# Altium PCB PCB1.PcbDoc (part 1 of 2)
Units mil, origin at the board's own origin, x right, y up, seen from the top; angles counter-clockwise.
Board outline 6000 x 4000 mil, 2 copper layers (Top Layer, Bottom Layer); 250 components, 133 nets, 708 pads, 265 vias.
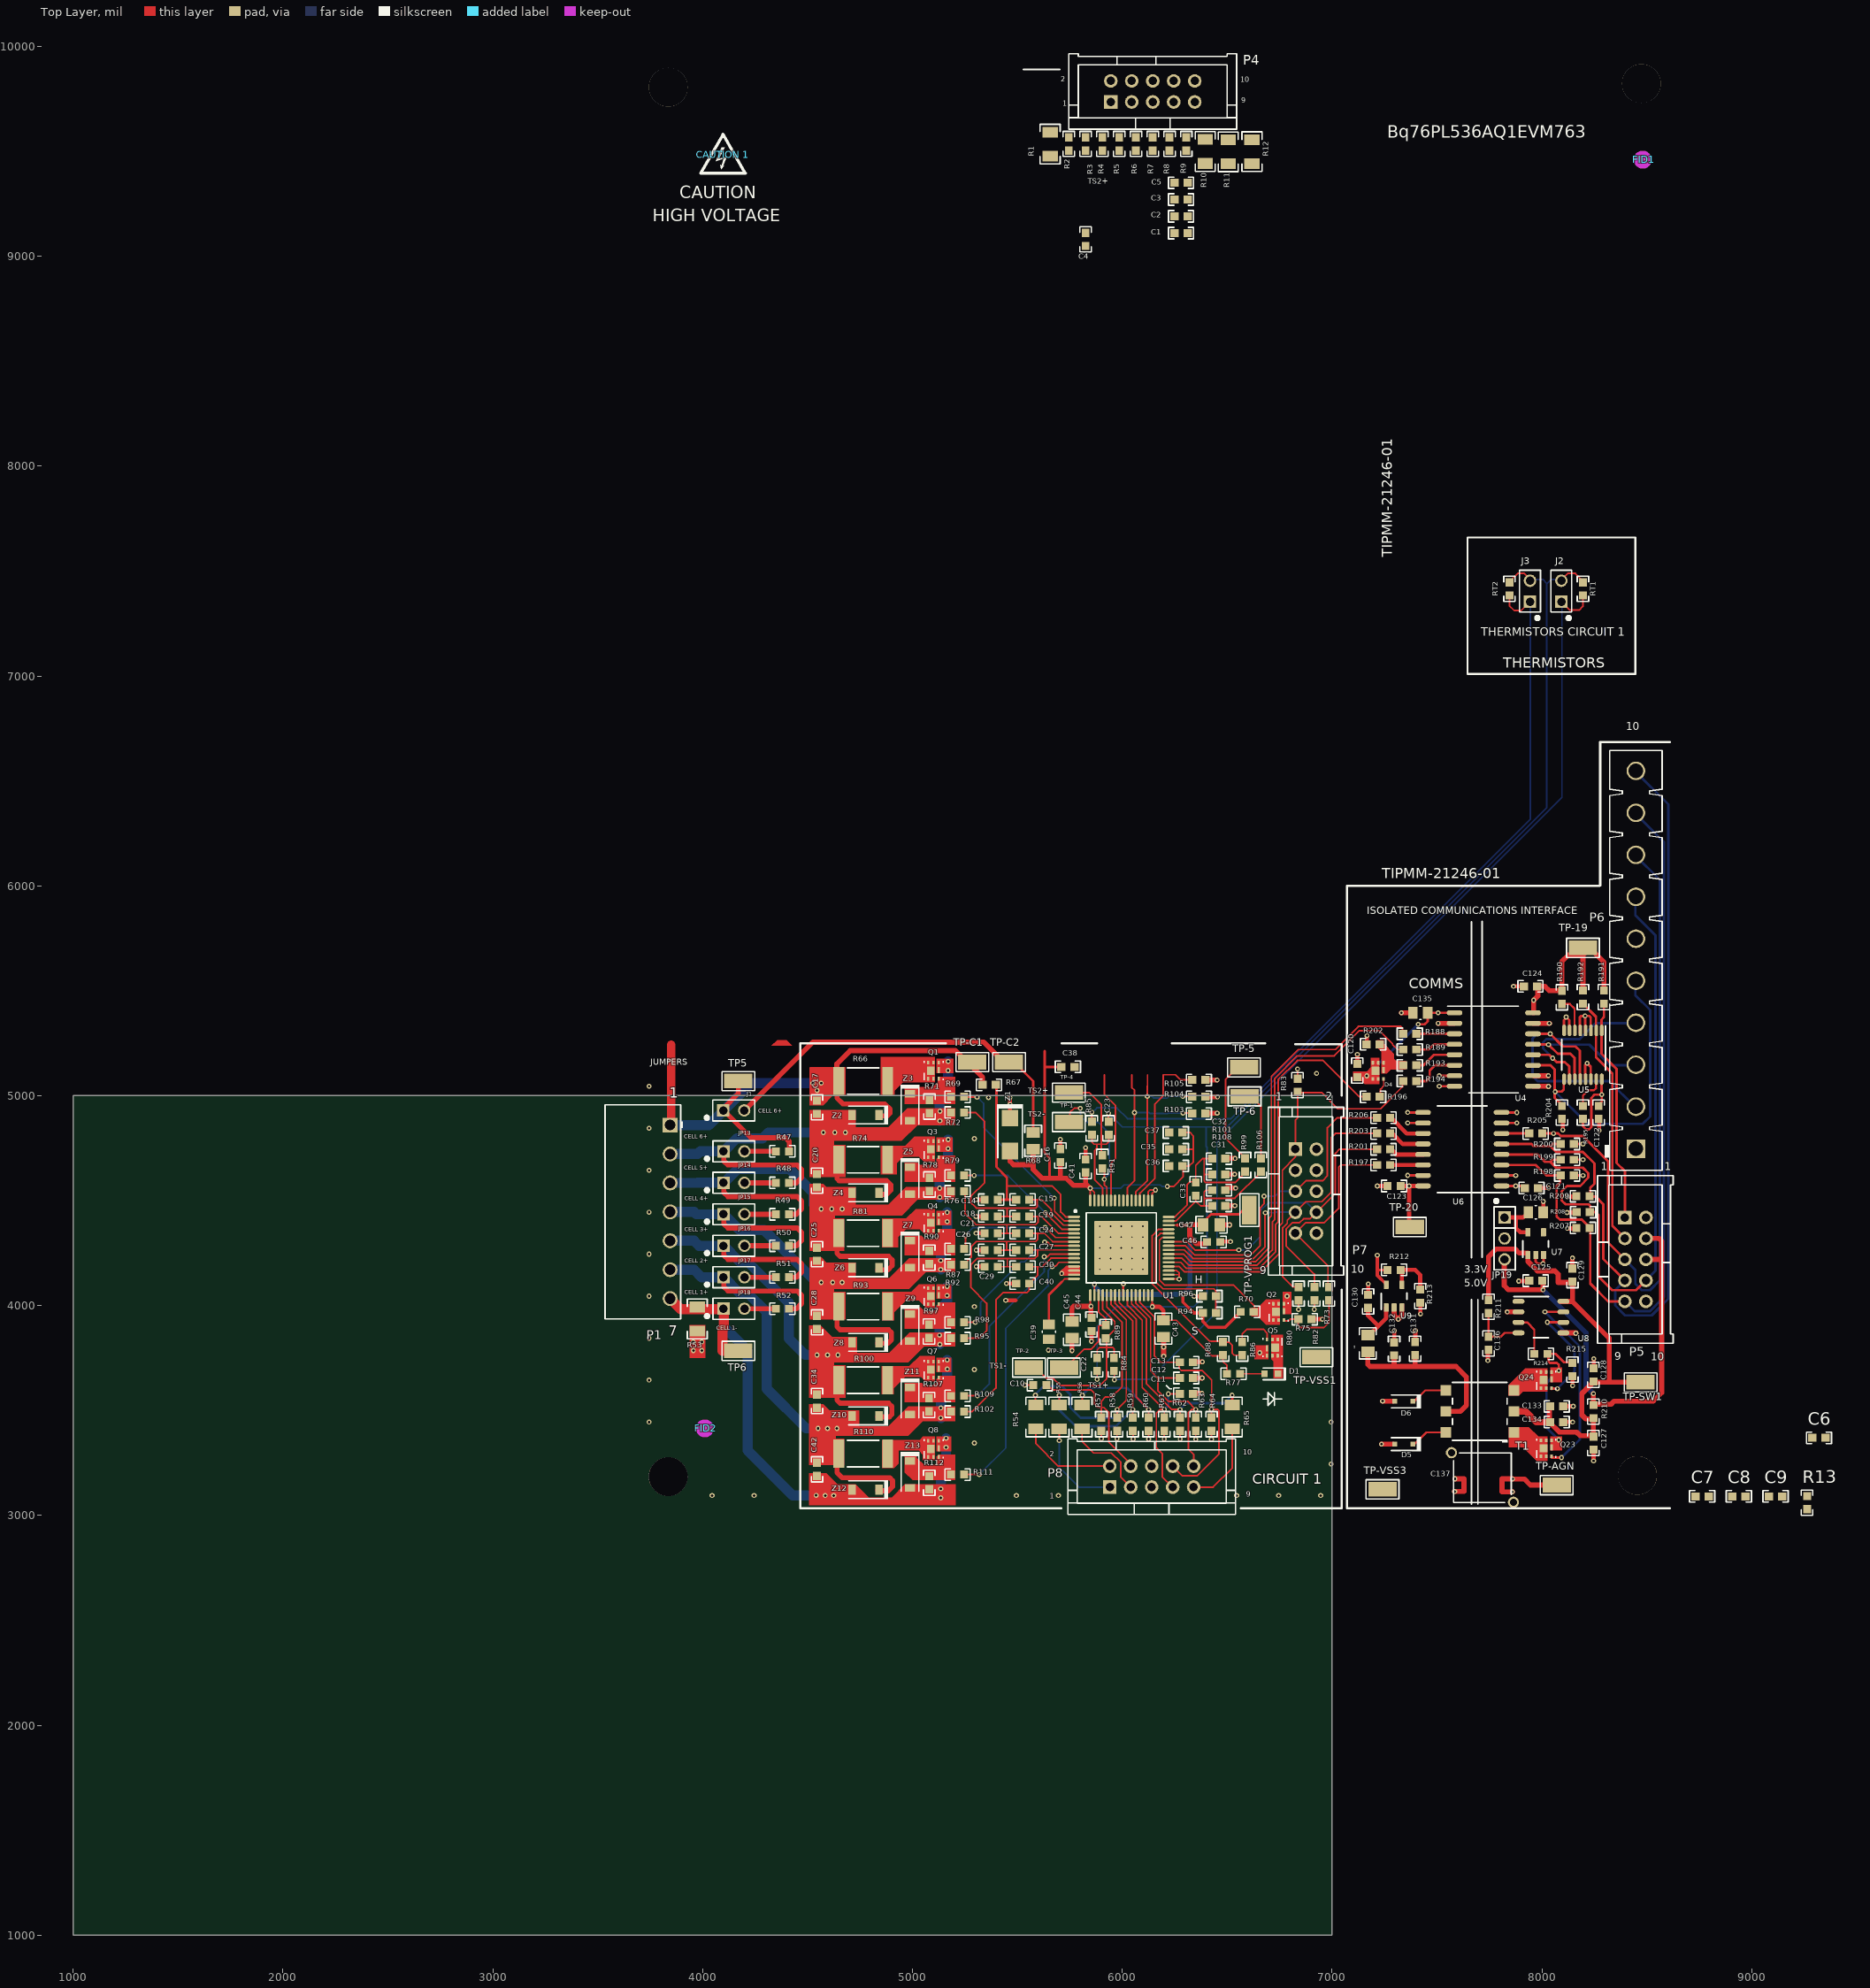
[diagram p0: Top Layer view]
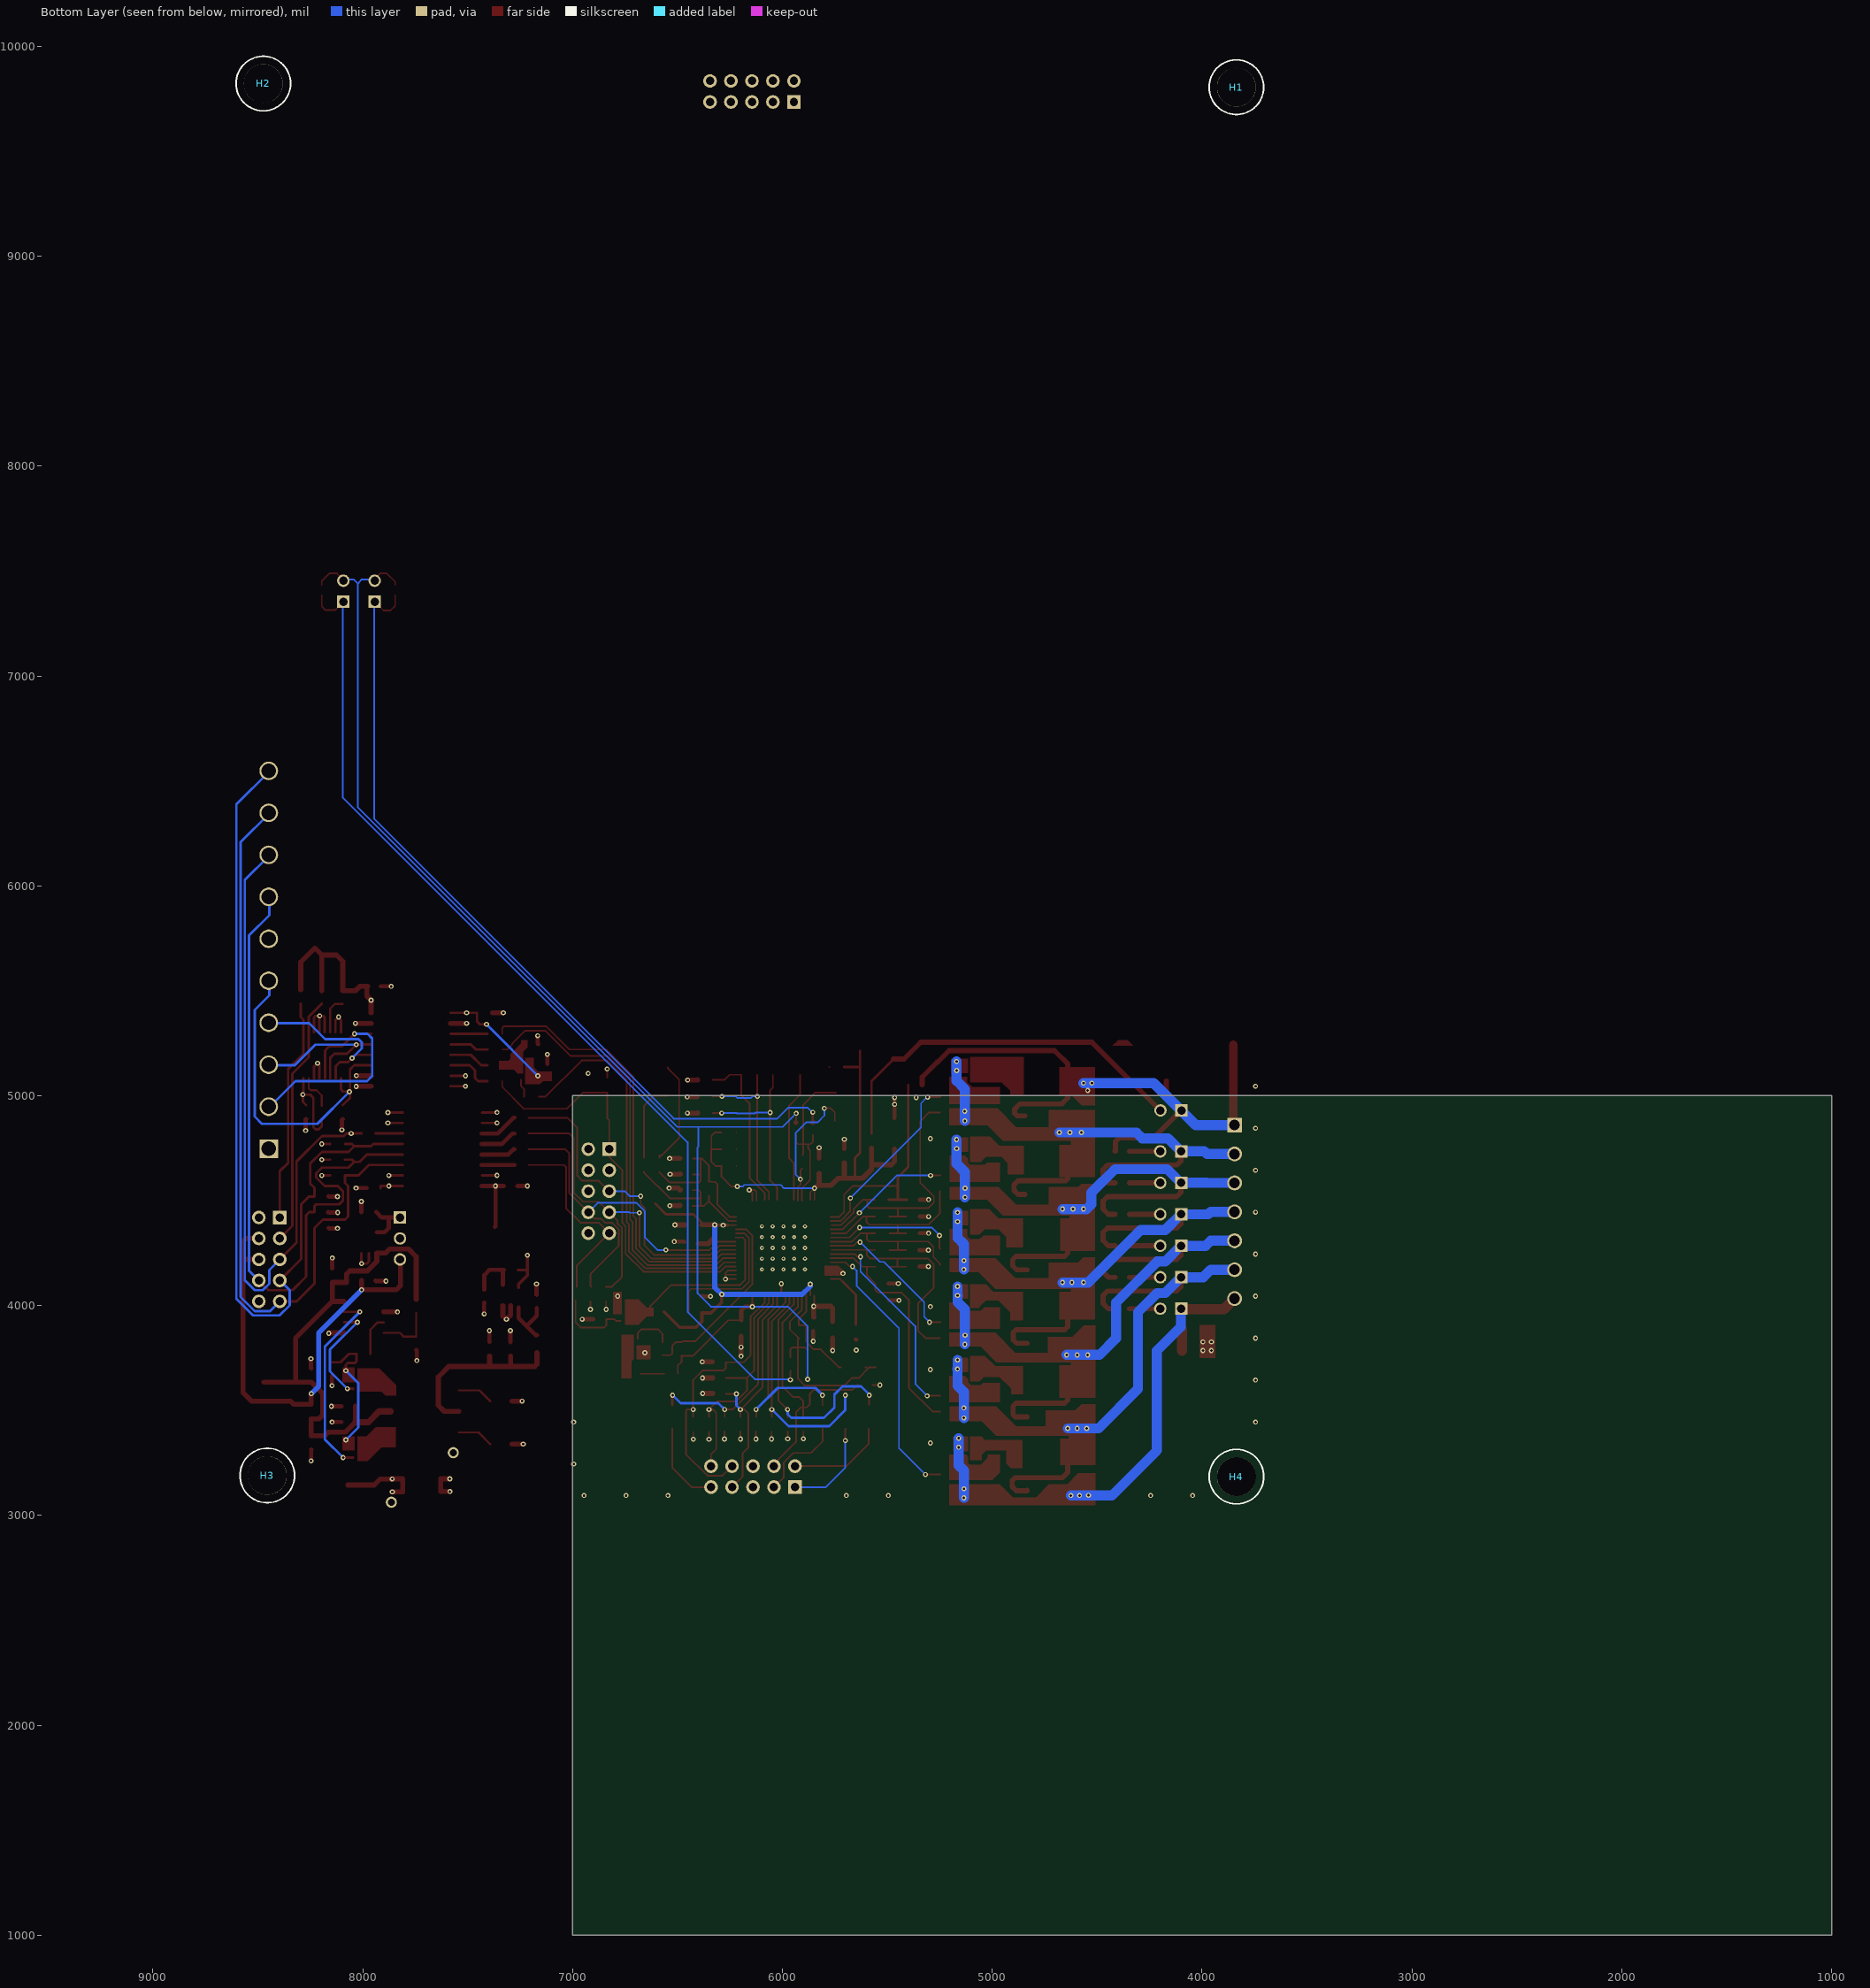
[diagram p1: Bottom Layer view, seen from below]

## Layer stack, top to bottom
Top Layer: signal copper 1.4
Dielectric: dielectric 12.6, FR-4, Dk 4.8
Bottom Layer: signal copper 1.4

## Board outline
1000,1000 7000,1000 7000,5000 1000,5000

## Design rules (kind name [scope] priority, off if disabled: settings)
Clearance [All] p1: gap=10
PolygonConnect [All] p1: connectstyle=Relief reliefconductorwidth=10 reliefentries=4 polygonreliefangle="90 Angle"
RoomDefinition Sheet1 [InComponentClass('Sheet1')] p1: confinementstyle=ConfineIn formatcopy=TRUE lockcomponents=FALSE outline 2953,1461 4953,1461 4953,2461 2953,2461
RoomDefinition Sheet2 [InComponentClass('Sheet2')] p2: confinementstyle=ConfineIn formatcopy=TRUE lockcomponents=FALSE outline 2953,1461 4953,1461 4953,2461 2953,2461
RoomDefinition Sheet5 [InComponentClass('Sheet5')] p3: confinementstyle=ConfineIn formatcopy=TRUE lockcomponents=FALSE outline 2953,1461 4953,1461 4953,2461 2953,2461
RoomDefinition Sheet_hardware [InComponentClass('Sheet_hardware')] p4: confinementstyle=ConfineIn formatcopy=TRUE lockcomponents=FALSE outline 2953,1461 4953,1461 4953,2461 2953,2461
RoutingVias [All] p1: holewidth=28 width=50 viastyle="Through Hole" minholewidth=28 minwidth=50 maxholewidth=28 maxwidth=50
SilkscreenOverComponentPads [All] p1: minsilkscreentomaskgap=10
SolderMaskExpansion [All] p1: expansion=4
TestPointUsage [All] p1: valid=0 allowmultiple=FALSE
Testpoint [All] p1: side=15 testpointundercomponent=TRUE minsize=40 maxsize=100 preferedsize=60 minholesize=0 maxholesize=40 preferedholesize=32 testpointgrid=1 style=1023 order=0123456789
Width [All] p1: maxlimit=10 minlimit=10 preferedwidth=10
23 further rules are at their usual default settings.

## Classes and differential pairs
component class Sheet_hardware: "CAUTION 1" FID1 FID2 H1 H2 H3 H4
component class Sheet5: C120 C121 C122 C123 C124 C125 C126 C127 C128 C129 C130 C131 C132 C133 C134 C135 C136 C137 D4 D5 D6 JP19 L1 Q23 Q24 R188 R189 R190 R191 R192 R193 R194 R195 R196 R197 R198 R199 R200 R201 R202 R203 R204 R205 R206 R207 R208 R209 R210 R211 R212 R213 R214 R215 T1 TP-19 TP-20 TP-AGN TP-SW1 TP-VSS3 U4 U5 U6 U7 U8 U9
component class Sheet2: C6 C7 C8 C9 C14 C15 C16 C17 C18 C19 C20 C21 C22 C23 C24 C25 C26 C27 C28 C29 C30 C31 C32 C33 C34 C35 C36 C37 C38 C39 C40 C41 C42 C43 C44 C45 C46 C47 D1 J1 J2 J3 Q1 Q2 Q3 Q4 Q5 Q6 Q7 Q8 R13 R66 R67 R68 R69 R70 R71 R72 R73 R74 R75 R76 R77 R78 R79 R80 R81 R82 R83 R84 R85 R86 R87 R88 R89 R90 R91 R92 R93 R94 R95 R96 R97 R98 R99 R100 R101 R102 R103 R104 R105 R106 R107 R108 R109 R110 R111 R112 RT1 RT2 TP-1 TP-2 TP-3 TP-4 TP-5 TP-6 TP-C1 TP-C2 TP-VPROG1 TP-VSS1 U1 Z1 Z2 Z3 Z4 Z5 Z6 Z7 Z8 Z9 Z10 Z11 Z12 Z13
component class Sheet1: C1 C2 C3 C4 C5 C10 C11 C12 C13 JP13 JP14 JP15 JP16 JP17 JP18 P1 P4 P5 P6 P7 P8 R1 R2 R3 R4 R5 R6 R7 R8 R9 R10 R11 R12 R47 R48 R49 R50 R51 R52 R53 R54 R55 R56 R57 R58 R59 R60 R61 R62 R63 R64 R65 TP5 TP6

## Components (designator, comment, footprint, x,y, rotation, side; value= is the part's Value field where it differs from the comment)
C1 "06035C104KAT2A" 0603[] 6280,9110 r180 top
C2 "06035C104KAT2A" 0603[] 6280,9190 r180 top
C3 "06035C104KAT2A" 0603[] 6280,9270 r180 top
C4 "06035C104KAT2A" 0603[] 5825,9080 r90 top
C5 "06035C104KAT2A" 0603[] 6280,9350 r180 top
C6 "GRM1885C1H330JA01D" 0603[] 9320,3370 r0 top
C7 "GRM1885C1H330JA01D" 0603[] 8763,3091 r0 top
C8 "GRM1885C1H330JA01D" 0603[] 8938,3091 r0 top
C9 "GRM1885C1H330JA01D" 0603[] 9113,3091 r0 top
C10 "06035C104KAT2A" 0603[] 5607,3621 r180 top
C11 "06035C104KAT2A" 0603[] 6305,3580 r0 top
C12 "06035C104KAT2A" 0603[] 6305,3655 r0 top
C13 "06035C104KAT2A" 0603[] 6305,3730 r0 top
C14 "06035C104KAT2A" 0603[] 5375,4505 r180 top
C15 "GRM188R72A104KA35D" 0603[] 5525,4505 r0 top
C16 "GRM188R72A104KA35D" 0603[] 5705,4715 r90 top
C17 "06035C104KAT2A" 0603[] 4545,4945 r270 top
C18 "06035C104KAT2A" 0603[] 5375,4425 r180 top
C19 "GRM188R72A104KA35D" 0603[] 5525,4425 r0 top
C20 "06035C104KAT2A" 0603[] 4545,4595 r270 top
C21 "06035C104KAT2A" 0603[] 5375,4345 r180 top
C22 "GRM188R71C473KA01D" 0603[] 5880,3720 r90 top
C23 "GRM188R71C473KA01D" 0603[] 5935,4845 r270 top
C24 "GRM188R72A104KA35D" 0603[] 5525,4345 r0 top
C25 "06035C104KAT2A" 0603[] 4545,4245 r270 top
C26 "06035C104KAT2A" 0603[] 5375,4265 r180 top
C27 "GRM188R72A104KA35D" 0603[] 5525,4265 r0 top
C28 "06035C104KAT2A" 0603[] 4545,3920 r270 top
C29 "06035C104KAT2A" 0603[] 5375,4185 r180 top
C30 "GRM188R72A104KA35D" 0603[] 5525,4185 r0 top
C31 "C0603C104K4RACTU" 0603[] 6460,4475 r0 top
C32 "C0603C104K4RACTU" 0603[] 6460,4700 r0 top
C33 "C0603C104K4RACTU" 0603[] 6350,4555 r270 top
C34 "GRM188R72A104KA35D" 0603[] 4545,3545 r270 top
C35 "GRM1885C1H330JA01D" 0603[] 6255,4745 r0 top
C36 "GRM1885C1H330JA01D" 0603[] 6255,4665 r0 top
C37 "GRM1885C1H330JA01D" 0603[] 6255,4825 r0 top
C38 "GRM1885C1H330JA01D" 0603[] 5740.67,5137.55 r180 top
C39 "C2012X7R1A106M125AC" 0805_145 5650,3875 r270 top
C40 "06035C104KAT2A" 0603[] 5525,4105 r180 top
C41 "06035C104KAT2A" 0603[] 5825,4665 r90 top
C42 "06035C104KAT2A" 0603[] 4545,3220 r270 top
C43 "GRM21BR71A225KA01L" 0805_HV 6196,3890 r270 top
C44 "06035C104KAT2A" 0603[] 5853,3910 r270 top
C45 "GRM21BR71A225KA01L" 0805_HV 5760,3885 r270 top
C46 "06035C104KAT2A" 0603[] 6435,4303 r0 top
C47 "GRM21BR71A225KA01L" 0805_HV 6425,4385 r0 top
C120 "06035C104KAT2A" 0603 7120,5120 r90 top
C121 "06035C104KAT2A" 0603 7950,4560 r0 top
C122 "06035C104KAT2A" 0603 8270,4920 r270 top
C123 "06035C104KAT2A" 0603 7295,4570 r180 top
C124 "06035C104KAT2A" 0603 7945,5521 r180 top
C125 "06035C104KAT2A" 0603 7970,4119 r180 top
C126 "C2012X7R1A106M125AC" 0805_145 7970,4445 r0 top
C127 "C1608X7R1C105K" 0603 8245,3345 r270 top
C128 "C0603C475K8PACTU" 0603 8245,3670 r90 top
C129 "06035C104KAT2A" 0603 8145,4145 r90 top
C130 "C0603C475K8PACTU" 0603 7171,4020 r90 top
C131 "C0603C475K8PACTU" 0603 7395,3795 r90 top
C132 "06035C104KAT2A" 0603 7295,3794 r90 top
C133 "06035C104KAT2A" 0603 8070,3520 r0 top
C134 "C0603C475K8PACTU" 0603 8070,3445 r0 top
C135 "C2012X7R1A106M125AC" 0805_145 7420,5395 r180 top
C136 "C0603C151J5GACTU" 0603 7745,3820 r270 top
C137 "DEBE33F102ZC3B" CAPRD750W60D700H1000 7716,3181 r180 top locked
"CAUTION 1" "DANGER HIGH VOLTAGE" IEC_HIGHVOLTAGE_SMALL 4097,9483 r0 top
D1 "APT1608SYCK" APT1608_YELLOW 6710,3675 r0 top
D4 "CSD25310Q2" TRANS_NEXFET_Q2 7219.53,5118.54 r90 top
D5 "BAT54HT1G" SOD-323 7342,3340 r180 top
D6 "BAT54HT1G" SOD-323 7342,3544 r180 top
FID1 "Fiducial" FIDUCIAL10-20 8480,9460 r0 top
FID2 "Fiducial" FIDUCIAL10-20 4010,3415 r0 top
H1 "9030" KEYSTONE_9030 3836.29,9805.08 r180 bottom locked
H2 "9030" KEYSTONE_9030 8473.51,9822.7 r180 bottom
H3 "9030" KEYSTONE_9030 8454.63,3190.37 r180 bottom
H4 "9030" KEYSTONE_9030 3835.84,3185.04 r180 bottom locked
J1 "PEC02SAAN" CONN_PEC02SAAN 4148,4930 r0 top
J2 "PEC02SAAN" CONN_PEC02SAAN 8092,7404 r90 top
J3 "PEC02SAAN" CONN_PEC02SAAN 7943,7404 r90 top
JP13 "PEC02SAAN" CONN_PEC02SAAN 4149,4735 r0 top
JP14 "PEC02SAAN" CONN_PEC02SAAN 4149,4585 r0 top
JP15 "PEC02SAAN" CONN_PEC02SAAN 4149,4435 r0 top
JP16 "PEC02SAAN" CONN_PEC02SAAN 4149,4285 r0 top
JP17 "PEC02SAAN" CONN_PEC02SAAN 4149,4135 r0 top
JP18 "PEC02SAAN" CONN_PEC02SAAN 4149,3985 r0 top
JP19 "PEC03SAAN" CONN_PEC03SAAN 7822,4320 r270 top
L1 "LB2012T100KR" 0805_HV 7170,3820 r90 top
P1 "395021007" MOLEX_395021007 3845,4446.61 r270 top locked
P4 "5103308-1" CONN_5103308-1 6145,9785 r0 top locked
P5 "5103308-1" CONN_5103308-1 8445,4220 r270 top locked
P6 "HPM-10-05-T-S" SAMTEC_HPM-10-05-T-S 8447.59,5647.75 r90 top
P7 "5103308-1" CONN_5103308-1 6875,4545 r270 top locked
P8 "5103308-1" CONN_5103308-1 6140,3185 r0 top locked
Q1 "CSD16301Q2" TRANS_NEXFET_Q2 5100,5119 r90 top
Q2 "CSD16301Q2" TRANS_NEXFET_Q2 6745,3970 r90 top
Q3 "CSD16301Q2" TRANS_NEXFET_Q2 5100,4745 r90 top
Q4 "CSD16301Q2" TRANS_NEXFET_Q2 5100,4395 r90 top
Q5 "CSD16301Q2" TRANS_NEXFET_Q2 6715,3800 r270 top
Q6 "CSD16301Q2" TRANS_NEXFET_Q2 5100,4045 r90 top
Q7 "CSD16301Q2" TRANS_NEXFET_Q2 5100,3695 r90 top
Q8 "CSD16301Q2" TRANS_NEXFET_Q2 5100,3317 r90 top
Q23 "CSD16301Q2" TRANS_NEXFET_Q2 8020,3320 r90 top
Q24 "CSD16301Q2" TRANS_NEXFET_Q2 8020,3645 r90 top
R1 "CRCW12061K00FKEA" 1206[] 5656,9534 r90 top
R2 "CRCW06030000Z0EA" 0603[] 5745,9535 r90 top
R3 "CRCW06030000Z0EA" 0603[] 5825,9535 r90 top
R4 "CRCW06030000Z0EA" 0603[] 5905,9535 r90 top
R5 "CRCW06030000Z0EA" 0603[] 5985,9535 r90 top
R6 "CRCW06030000Z0EA" 0603[] 6065,9535 r90 top
R7 "CRCW06030000Z0EA" 0603[] 6145,9535 r90 top
R8 "CRCW06030000Z0EA" 0603[] 6225,9535 r90 top
R9 "CRCW06030000Z0EA" 0603[] 6305,9535 r90 top
R10 "CRCW12061K00FKEA" 1206[] 6395,9499 r90 top
R11 "CRCW12061K00FKEA" 1206[] 6505,9497.63 r90 top
R12 "CRCW12061K00FKEA" 1206[] 6617.87,9497.81 r90 top
R13 "CRCW06030000Z0EA" 0603[] 9263,3061 r90 top
R47 "CRCW06031K00JNEA" 0603[] 4380,4735 r0 top
R48 "CRCW06031K00JNEA" 0603[] 4380,4585 r0 top
R49 "CRCW06031K00JNEA" 0603[] 4380,4435 r0 top
R50 "CRCW06031K00JNEA" 0603[] 4380,4285 r0 top
R51 "CRCW06031K00JNEA" 0603[] 4380,4135 r0 top
R52 "CRCW06031K00JNEA" 0603[] 4380,3985 r0 top
R53 "CRCW12060000Z0EA" 1206[] 3974.46,3936.2 r90 top
R54 "CRCW12061K00FKEA" 1206[] 5588,3469.49 r90 top
R55 "CRCW12061K00FKEA" 1206[] 5698,3469.49 r90 top
R56 "CRCW12061K00FKEA" 1206[] 5808,3469.49 r90 top
R57 "CRCW06031K00JNEA" 0603[] 5900,3435 r90 top
R58 "CRCW06031K00JNEA" 0603[] 5975,3435 r90 top
R59 "CRCW06031K00JNEA" 0603[] 6050,3435 r90 top
R60 "CRCW06031K00JNEA" 0603[] 6125,3435 r90 top
R61 "CRCW06031K00JNEA" 0603[] 6200,3435 r90 top
R62 "CRCW06031K00JNEA" 0603[] 6275,3435 r90 top
R63 "CRCW06031K00JNEA" 0603[] 6350,3435 r90 top
R64 "CRCW06031K00JNEA" 0603[] 6425,3435 r90 top
R65 "CRCW12061K00FKEA" 1206[] 6524,3469.49 r90 top
R66 "CRCW251247R0JNEG" 2512 4765,5070 r180 top
R67 "RG1608P-102-B-T5" 0603[] 5365.02,5051.75 r180 top
R68 "CRCW08050000Z0EA" 0805_HV 5575,4785 r270 top
R69 "RG1608P-102-B-T5" 0603[] 5215,4995 r180 top
R70 "ERJ-3EKF1002V" 0603[] 6595,3970 r180 top
R71 "CRCW06031M00JNEA" 0603[] 5081,4948 r90 top
R72 "RG1608P-102-B-T5" 0603[] 5215,4920 r180 top
R73 "RG1608P-102-B-T5" 0603[] 6985,4057 r270 top
R74 "CRCW251247R0JNEG" 2512 4765,4695 r180 top
R75 "ERJ-3EKF1002V" 0603[] 6870,3935 r180 top
R76 "RG1608P-102-B-T5" 0603[] 5215,4620 r180 top
R77 "CRCW06031K60JNEA" 0603[] 6530,3675 r180 top
R78 "CRCW06031M00JNEA" 0603[] 5081,4577 r90 top
R79 "RG1608P-102-B-T5" 0603[] 5215,4545 r180 top
R80 "ERJ-3EKF1002V" 0603[] 6840,4057 r270 top
R81 "CRCW251247R0JNEG" 2512 4765,4345 r180 top
R82 "ERJ-3EKF1002V" 0603[] 6915,4057 r270 top
R83 "ERJ-3EKF1002V" 0603[] 6835,5050 r90 top
R84 "CRCW06031K47FKEA" 0603[] 5960,3720 r270 top
R85 "CRCW06031K47FKEA" 0603[] 5855,4845 r90 top
R86 "CRCW0603100KFKEA" 0603[] 6480,3795 r270 top
R87 "RG1608P-102-B-T5" 0603[] 5215,4270 r180 top
R88 "CRCW0603100RJNEA" 0603[] 6571,3795 r270 top
R89 "CRCW06031K82FKEA" 0603[] 5921,3875 r270 top
R90 "CRCW06031M00JNEA" 0603[] 5080,4229 r90 top
R91 "CRCW06031K82FKEA" 0603[] 5905,4685 r90 top
R92 "RG1608P-102-B-T5" 0603[] 5215,4195 r180 top
R93 "CRCW251247R0JNEG" 2512 4765,3995 r180 top
R94 "CRCW06030000Z0EA" 0603[] 6415,3965 r180 top
R95 "RG1608P-102-B-T5" 0603[] 5215,3920 r180 top
R96 "CRCW06030000Z0EA" 0603[] 6415,4045 r0 top
R97 "CRCW06031M00JNEA" 0603[] 5079,3877 r90 top
R98 "RG1608P-102-B-T5" 0603[] 5215,3845 r180 top
R99 "CRCW06030000Z0EA" 0603[] 6585,4670 r90 top
R100 "CRCW251247R0JNEG" 2512 4765,3645 r180 top
R101 "CRCW06030000Z0EA" 0603[] 6460,4625 r0 top
R102 "RG1608P-102-B-T5" 0603[] 5215,3570 r180 top
R103 "CRCW06030000Z0EA" 0603[] 6365,4915 r180 top
R104 "CRCW06030000Z0EA" 0603[] 6365,4995 r180 top
R105 "CRCW06030000Z0EA" 0603[] 6365,5075 r180 top
R106 "CRCW06030000Z0EA" 0603[] 6660,4670 r90 top
R107 "CRCW06031M00JNEA" 0603[] 5079,3527 r90 top
R108 "CRCW06030000Z0EA" 0603[] 6460,4550 r0 top
R109 "RG1608P-102-B-T5" 0603[] 5215,3495 r180 top
R110 "CRCW251247R0JNEG" 2512 4765,3295 r180 top
R111 "RG1608P-102-B-T5" 0603[] 5215,3195 r180 top
R112 "CRCW06031M00JNEA" 0603[] 5080,3156 r90 top
R188 "CRCW0603100RJNEA" 0603 7370,5295 r0 top
R189 "CRCW0603100RJNEA" 0603 7370,5220 r0 top
R190 "CRCW06031M00JNEA" 0603 8095,5469 r90 top
R191 "CRCW06031M00JNEA" 0603 8295,5470 r90 top
R192 "CRCW06031M00JNEA" 0603 8195,5470 r90 top
R193 "CRCW0603100RJNEA" 0603 7370,5145 r0 top
R194 "CRCW0603100RJNEA" 0603 7370,5070 r0 top
R195 "CRCW06031M00JNEA" 0603 8195,4920 r270 top
R196 "ERJ-3EKF1002V" 0603 7195,4995 r0 top
R197 "CRCW0603100RJNEA" 0603 7245,4670 r180 top
R198 "CRCW06030000Z0EA" 0603 8120,4620 r0 top
R199 "CRCW06030000Z0EA" 0603 8120,4695 r0 top
R200 "CRCW06030000Z0EA" 0603 8120,4770 r0 top
R201 "CRCW0603100RJNEA" 0603 7245,4745 r180 top
R202 "RG1608P-102-B-T5" 0603 7195,5245 r0 top
R203 "CRCW0603100RJNEA" 0603 7245,4820 r180 top
R204 "CRCW0603100KFKEA" 0603 8095,4920 r90 top
R205 "CRCW0603100RJNEA" 0603 7970,4820 r180 top
R206 "CRCW0603100RJNEA" 0603 7245,4895 r180 top
R207 "ERJ-3EKF1002V" 0603 8195,4370 r0 top
R208 "ERJ-3EKF1002V" 0603 8196,4445 r0 top
R209 "ERJ-3EKF1002V" 0603 8195,4521 r0 top
R210 "RC0603FR-072RL" 0603 8245,3495 r270 top
R211 "ERJ-3EKF1002V" 0603 7745,3995 r270 top
R212 "RC0603FR-07523KL" 0603 7295,4170 r0 top
R213 "RC0603FR-07169KL" 0603 7420,4045 r90 top
R214 "RG1608P-102-B-T5" 0603 7995,3770 r0 top
R215 "CRCW06031R00JNEA" 0603 8145,3695 r90 top
RT1 "ERT-J1VG103FA" 0603[] 8195,7415 r90 top
RT2 "ERT-J1VG103FA" 0603[] 7845,7415 r90 top
T1 "Transformer, 400 uH, SMT" COILCRAFT_Q4470-CL 7704,3496 r180 top
TP5 "5015" TESTPOINT_KEYSTONE_MINIATURE 4170,5070 r0 top
TP6 "5015" TESTPOINT_KEYSTONE_MINIATURE 4170,3785 r0 top
TP-1 "5015" TESTPOINT_KEYSTONE_MINIATURE 5745,4875 r0 top
TP-2 "5015" TESTPOINT_KEYSTONE_MINIATURE 5555,3705 r0 top
TP-3 "5015" TESTPOINT_KEYSTONE_MINIATURE 5722,3705 r0 top
TP-4 "5015" TESTPOINT_KEYSTONE_MINIATURE 5745,5015 r0 top
TP-5 "5015" TESTPOINT_KEYSTONE_MINIATURE 6580,5135 r0 top
TP-6 "5015" TESTPOINT_KEYSTONE_MINIATURE 6582.44,4997.02 r0 top
TP-19 "5015" TESTPOINT_KEYSTONE_MINIATURE 8195,5705 r0 top
TP-20 "5020" TESTPOINT_KEYSTONE_MINIATURE 7370,4375 r0 top
TP-AGN "5015" TESTPOINT_KEYSTONE_MINIATURE 8070,3145 r0 top
TP-C1 "5015" TESTPOINT_KEYSTONE_MINIATURE 5285,5160 r0 top
TP-C2 "5015" TESTPOINT_KEYSTONE_MINIATURE 5460,5160 r0 top
TP-SW1 "5015" TESTPOINT_KEYSTONE_MINIATURE 8470,3635 r0 top
TP-VPROG1 "5015" TESTPOINT_KEYSTONE_MINIATURE 6605,4455 r90 top
TP-VSS1 "5015" TESTPOINT_KEYSTONE_MINIATURE 6925,3755 r0 top
TP-VSS3 "5015" TESTPOINT_KEYSTONE_MINIATURE 7240,3125 r0 top
U1 "BQ76PL536ATPAPRQ1" PAP0064F_N 5995,4275 r0 top locked
U4 "ISO7241CDW" DW0016A_N 7770,5220 r0 top locked
U5 "PCA9557PWR" PW0016A_N 8195,5195 r270 top locked
U6 "ISO7241CDW" DW0016A_N 7620,4745 r180 top locked
U7 "TPS76933DBVR" DBV0005A_N 7970,4295 r90 top
U8 "UCC2808DTR-2" D0008A_N 7995,3945 r0 top
U9 "TPS76901DBV" DBV0005A_N 7295,4045 r90 top
Z1 "SMAJ36CA" SMA 5465,4815 r270 top
Z2 "MMSZ5232B-7-F" SOD-123 4776,4908 r180 top
Z3 "MMSZ5232B-7-F" SOD-123 4988,4945 r270 top
Z4 "MMSZ5232B-7-F" SOD-123 4776,4537 r180 top
Z5 "MMSZ5232B-7-F" SOD-123 4988,4595 r270 top
Z6 "MMSZ5232B-7-F" SOD-123 4776,4180 r180 top
Z7 "MMSZ5232B-7-F" SOD-123 4988,4245 r270 top
Z8 "MMSZ5232B-7-F" SOD-123 4776,3825 r180 top
Z9 "MMSZ5232B-7-F" SOD-123 4988,3895 r270 top
Z10 "MMSZ5232B-7-F" SOD-123 4776,3474 r180 top
Z11 "MMSZ5232B-7-F" SOD-123 4988,3545 r270 top
Z12 "MMSZ5232B-7-F" SOD-123 4776,3123 r180 top
Z13 "MMSZ5232B-7-F" SOD-123 4988,3195 r270 top

## Footprints (in the part's own frame and the unit in brackets; to place one, negate y for a bottom-side part, rotate by r counter-clockwise, add the part's x,y. Pads: shape width x height; smd on the part's side, far side on the other; paste and mask are expansions set on the pad)
0603 [mm] "0603 from SM-752 data"
  rect 1x0.95 smd: 1(-0.8,0) 2(0.8,0)
  silkscreen extent -1.52,-0.69 1.52,0.69, body extent -0.87,-0.47 0.87,0.47, height 0.85
0603[] [mm] "0603 from SM-752 data"
  rect 1x0.95 smd: 1(-0.8,0) 2(0.8,0)
  silkscreen extent -1.52,-0.69 1.52,0.69, body extent -0.87,-0.47 0.87,0.47, height 0.85
0805_145 [mm] "0805 / 1.45mm height"
  rect 1.15x1.45 smd: 1(-0.9,0) 2(0.9,0)
  silkscreen extent -0.1,-0.8 0.1,0.8, body extent -1.1,-0.72 1.1,0.72, height 1.45
0805_HV [mil] "0805 with 30mil clearance between pads"
  rect 50x63 smd: 1(-40,0) 2(40,0)
  silkscreen extent -74,-40 74,40, body extent -43,-29 43,29, height 57
1206[] [mm] "1206 from SM-752 data"
  rect 1.3x1.85 smd: 1(-1.45,0) 2(1.45,0)
  silkscreen extent -2.4,-1.21 2.4,1.21, body extent -1.7,-0.9 1.7,0.9, height 1.35
2512 [mm] "Chip Resistor, Body 6.3x3.2mm, IPC Medium Density"
  rect 1.3x3.4 smd: 1(-2.95,0) 2(2.95,0)
  silkscreen extent -1.9,-1.6 1.9,1.6, body extent -3.22,-1.67 3.22,1.67, height 0.71
APT1608_YELLOW [mm] "SMD, 2-Leads, Body 0.8x1.6mm"
  rect 0.8x0.8 smd: 1(-0.825,0) 2(0.825,0)
  silkscreen extent -1,-0.7 1.8,0.7, body extent -0.8,-0.4 0.81,0.4, height 0.76
CAPRD750W60D700H1000 [mm] "muRata"
  round 1.35 hole 0.85: 1(-3.75,3) 2(3.75,-3)
  silkscreen extent -3.5,-2.95 3.47,3.05, body extent -4.26,-3.51 4.26,3.51, height 9.97
COILCRAFT_Q4470-CL [mm] "SMD, 6-Leads, Body 6.6x6.99mm, Pitch 2.54mm"
  rect 1.27x1.27 smd: 1(-4.13,2.54) 2(-4.13,0) 3(-4.13,-2.54) 4(4.13,-2.54) 5(4.13,0) 6(4.13,2.54)
  silkscreen extent -3.4,-3.5 3.3,3.8, body extent -4.25,-3.49 4.25,3.5, height 5.46
CONN_5103308-1 [mm] "TE Connectivity (AMP) Rev E datasheet"
  rect 1.65x1.65 hole 1.016: 1(-5.08,-1.27)
  round 1.65 hole 1.016: 2(-5.08,1.27) 3(-2.54,-1.27) 4(-2.54,1.27) 5(0,-1.27) 6(0,1.27) 7(2.54,-1.27) 8(2.54,1.27) 9(5.08,-1.27) 10(5.08,1.27)
  silkscreen extent -10.16,-4.57 10.16,4.57, body extent -10.16,-4.57 10.16,4.57, height 9.87
CONN_PEC02SAAN [mm] "SULLINS"
  rect 1.5x1.5 hole 1.016: 1(-1.27,0)
  round 1.5 hole 1.016: 2(1.27,0)
  silkscreen extent -3.45,-1.27 2.54,1.27, body extent -2.54,-1.27 2.54,1.27, height 8.38
CONN_PEC03SAAN [mm] "SULLINS"
  rect 1.5x1.5 hole 1.016: 1(-2.54,0)
  round 1.5 hole 1.016: 2(0,0) 3(2.54,0)
  silkscreen extent -4.72,-1.27 3.81,1.27, body extent -3.84,-1.3 3.84,1.3, height 8.38
D0008A_N [mm] "SOIC, 8-Leads, Body 4.9x3.9mm, Pitch 1.27mm, IPC Medium Density"
  oval 1.45x0.6 smd: 1(-2.725,1.905) 2(-2.725,0.635) 3(-2.725,-0.635) 4(-2.725,-1.905) 5(2.725,-1.905) 6(2.725,-0.635) 7(2.725,0.635) 8(2.725,1.905)
  silkscreen extent -3.3,-2.5 0.9,2.5, body extent -3,-2.45 3,2.45, height 1.63
DBV0005A_N [mm] "SOT23, 5-Leads, Body 2.9x1.6mm, Pitch 0.95mm, Lead Span 2.8mm, IPC Medium Density"
  rrect17% 1x0.6 smd: 1(-1.375,0.95) 2(-1.375,0) 3(-1.375,-0.95) 4(1.375,-0.95) 5(1.375,0.95)
  silkscreen extent -1.63,-1.55 0.38,1.55, body extent -1.42,-1.46 1.42,1.46, height 1.09
DW0016A_N [mm] "SOIC, 16-Leads, Body 10.3x7.5mm, Pitch 1.27mm, IPC Medium Density"
  oval 1.9x0.6 smd: 1(-4.75,4.445) 2(-4.75,3.175) 3(-4.75,1.905) 4(-4.75,0.635) 5(-4.75,-0.635) 6(-4.75,-1.905) 7(-4.75,-3.175) 8(-4.75,-4.445) 9(4.75,-4.445) 10(4.75,-3.175) 11(4.75,-1.905) 12(4.75,-0.635) 13(4.75,0.635) 14(4.75,1.905) 15(4.75,3.175) 16(4.75,4.445)
  silkscreen extent -5.6,-5.25 3,5.25, body extent -5.14,-5.13 5.14,5.13, height 2.54
FIDUCIAL10-20 [mm]
  round 1 smd: 1(0.102,0)
  Top Layer keep-out circle w1.178: c0,0 r0.5
IEC_HIGHVOLTAGE_SMALL [mil]
  silkscreen extent -107,-88 107,97
KEYSTONE_9030 [mm] "BRD SPT SNAP LOCK SCREW MNT 3/8\""
  round 4.7 hole 4.7 unplated: ""(0,0)
  silkscreen extent -3.3,-3.3 3.3,3.3, body extent -3.3,-3.3 3.3,3.3, height 12.7
MOLEX_395021007 [mm] "Header(Shrouded), 3.5mm, 7x1,  R/A, TH"
  rect 1.8x1.8 hole 1.3: 1(-10.5,0)
  round 1.8 hole 1.3: 2(-7,0) 3(-3.5,0) 4(0,0) 5(3.5,0) 6(7,0) 7(10.5,0)
  silkscreen extent -12.95,-7.87 12.95,1.52, body extent -12.95,-7.87 12.95,1.27, height 6.86
PAP0064F_N [mm] "Thin QFP, 64-Leads, Body 10x10mm, Pitch 0.5mm, Thermal Pad 6.5x6.5mm, IPC Medium Density"
  rrect100% 1.45x0.3 smd: 1(-5.725,3.75) 2(-5.725,3.25) 3(-5.725,2.75) 4(-5.725,2.25) 5(-5.725,1.75) 6(-5.725,1.25) 7(-5.725,0.75) 8(-5.725,0.25) 9(-5.725,-0.25) 10(-5.725,-0.75) 11(-5.725,-1.25) 12(-5.725,-1.75) 13(-5.725,-2.25) 14(-5.725,-2.75) 15(-5.725,-3.25) 16(-5.725,-3.75) 33(5.725,-3.75) 34(5.725,-3.25) 35(5.725,-2.75) 36(5.725,-2.25) 37(5.725,-1.75) 38(5.725,-1.25) 39(5.725,-0.75) 40(5.725,-0.25) 41(5.725,0.25) 42(5.725,0.75) 43(5.725,1.25) 44(5.725,1.75) 45(5.725,2.25) 46(5.725,2.75) 47(5.725,3.25) 48(5.725,3.75)
  rrect100% 0.3x1.45 smd: 17(-3.75,-5.725) 18(-3.25,-5.725) 19(-2.75,-5.725) 20(-2.25,-5.725) 21(-1.75,-5.725) 22(-1.25,-5.725) 23(-0.75,-5.725) 24(-0.25,-5.725) 25(0.25,-5.725) 26(0.75,-5.725) 27(1.25,-5.725) 28(1.75,-5.725) 29(2.25,-5.725) 30(2.75,-5.725) 31(3.25,-5.725) 32(3.75,-5.725) 49(3.75,5.725) 50(3.25,5.725) 51(2.75,5.725) 52(2.25,5.725) 53(1.75,5.725) 54(1.25,5.725) 55(0.75,5.725) 56(0.25,5.725) 57(-0.25,5.725) 58(-0.75,5.725) 59(-1.25,5.725) 60(-1.75,5.725) 61(-2.25,5.725) 62(-2.75,5.725) 63(-3.25,5.725) 64(-3.75,5.725)
  rrect2% 6.5x6.5 smd: 65(0,0)
  silkscreen extent -5.67,-4.25 4.25,4.57, body extent -6.01,-6.01 6.01,6.01, height 1.2
PW0016A_N [mm] "TSOP, 16-Leads, Body 5x4.4mm, Pitch 0.65mm, IPC Medium Density"
  oval 1.4x0.45 smd: 1(-2.95,2.275) 2(-2.95,1.625) 3(-2.95,0.975) 4(-2.95,0.325) 5(-2.95,-0.325) 6(-2.95,-0.975) 7(-2.95,-1.625) 8(-2.95,-2.275) 9(2.95,-2.275) 10(2.95,-1.625) 11(2.95,-0.975) 12(2.95,-0.325) 13(2.95,0.325) 14(2.95,0.975) 15(2.95,1.625) 16(2.95,2.275)
  silkscreen extent -3.5,-2.55 1.85,2.75, body extent -3.21,-2.5 3.21,2.5, height 1
SAMTEC_HPM-10-05-T-S [mm] "Header, 5.08mm, 10x1, TH"
  rect 2.25x2.25 hole 1.75: 1(-22.86,0)
  round 2.25 hole 1.75: 2(-17.78,0) 3(-12.7,0) 4(-7.62,0) 5(-2.54,0) 6(2.54,0) 7(7.62,0) 8(12.7,0) 9(17.78,0) 10(22.86,0)
  silkscreen extent -25.47,-3.17 25.33,3.8, body extent -25.47,-3.17 25.33,3.18, height 7.15
SMA [mm] "Molded Diode, 2-Leads, Body 4.3x2.6mm, IPC Medium Density, based on OnSemi component dimensions and land pattern"
  rect 2x2 smd: 1(-2,0) 2(2,0)
  silkscreen extent -3.66,-1.57 2.79,1.57, body extent -2.6,-1.3 2.6,1.3, height 2.42
SOD-123 [mm] "On Semi recommended land pattern"
  rect 0.915x1.22 smd: 1(-1.637,0) 2(1.637,0)
  silkscreen extent -2.74,-1.17 2.03,1.17, body extent -1.93,-0.9 1.93,0.9, height 1.35
SOD-323 [mm] "NXP recommended land pattern"
  rect 0.6x0.6 smd: 1(-1.1,0) 2(1.1,0)
  silkscreen extent -2.06,-0.86 1.53,0.86, body extent -1.3,-0.67 1.3,0.68, height 1.1
TESTPOINT_KEYSTONE_MINIATURE [mil] "Miniature SMT test point"
  rect 135x70 smd: 1(0,0)
  silkscreen extent -78,-46 78,45, body extent -52,-20 52,20, height 61
TRANS_NEXFET_Q2 [mm] "TI recommended land pattern M0167-01"
  rrect33% 0.45x0.3 smd: 1(-0.975,0.65) 2(-0.975,0) 3(-0.975,-0.65) 4(0.975,-0.65) 5(0.975,0) 6(0.975,0.65)
  rrect33% 0.75x0.3 smd: 7(0.095,-0.65)
  rrect11% 1x0.95 smd: 8(0,0.325)
  body extent -1,-1 1,1, height 0.85

## Part data
C1 C2 C3 C4 C5 C10 C11 C12 C13 C120 C121 C122 C123 C124 C125 C129 C132 C133: "CAP, CERM, 0.1 µF, 50 V, +/- 10%, X7R, 0603"
C6 C7 C8 C9 C35 C36 C37 C38: "CAP, CERM, 33 pF, 50 V, +/- 5%, C0G/NP0, 0603"
C14 C17 C18 C20 C21 C25 C26 C28 C29 C40 C41 C42 C44 C46: "CAP, CERM, 0.1uf, 50 V, +/- 10%, X7R, 0603"
C15 C16 C19 C24 C27 C30 C34: "CAP, CERM, 0.1uf, 100 V, +/- 10%, X7R, 0603"
C22 C23: "CAP, CERM, 0.047 µF, 16 V, +/- 10%, X7R, 0603"
C31 C32 C33: "CAP, CERM, 0.1 µF, 16 V, +/- 10%, X7R, 0603"
C39 C126 C135: "CAP, CERM, 10 µF, 10 V, +/- 20%, X7R, 0805"
C43 C45 C47: "CAP, CERM, 2.2 µF, 10 V, +/- 10%, X7R, 0805"
C127: "CAP, CERM, 1 µF, 16 V, +/- 10%, X7R, 0603"
C128 C130 C131 C134: "CAP, CERM, 4.7 µF, 10 V, +/- 10%, X5R, 0603"
C136: "CAP, CERM, 150 pF, 50 V, +/- 5%, C0G/NP0, 0603"
C137: "CAP, CERM, 1000 pF, 3150 V, +80/-20%, E, Radial Disc D7x6mm"
"CAUTION 1": library part IEC_HighVoltage, "IEC 61010-1 High Voltage Warning"
D1: "LED, Yellow, SMD"
D4: "MOSFET, P-CH, -20 V, -20 A, SON 2x2mm"
D5 D6: "Diode, Schottky, 30 V, 0.2 A, SOD-323"
FID1 FID2: "Fiducial mark.  There is nothing to buy or mount."
H1 H2 H3 H4: "BRD SPT SNAP LOCK SCREW MNT 3/8\""
J1 J2 J3 JP13 JP14 JP15 JP16 JP17 JP18: "Header, 100mil, 2x1, Tin, TH"
JP19: "Header, 100mil, 3x1, Tin, TH"
L1: "Inductor, Wirewound, Ferrite, 10uH, 0.12A, 0.5 ohm, SMD"
P1: "Header(Shrouded), 3.5mm, 7x1,  R/A, TH"
P4 P5 P7 P8: "Header (shrouded), 100mil, 5x2, Gold, TH"
P6: "Header, 5.08mm, 10x1, Tin, TH"
Q1 Q2 Q3 Q4 Q5 Q6 Q7 Q8 Q23 Q24: "MOSFET, N-CH, 25 V, 5 A, SON 2x2mm"
R1 R10 R11 R12 R54 R55 R56 R65: library part CRCW06031K00JNEA, "RES, 1.00 k, 1%, 0.25 W, 1206"
R2 R3 R4 R5 R6 R7 R8 R9 R13 R94 R96 R99 R101 R103 R104 R105 R106 R108 R198 R199 R200: "RES, 0, 5%, 0.1 W, 0603"
R47 R48 R49 R50 R51 R52 R57 R58 R59 R60 R61 R62 R63 R64: "RES, 1.0 k, 5%, 0.1 W, 0603"
R53: "RES, 0, 5%, 0.25 W, 1206"
R66 R74 R81 R93 R100 R110: "RES, 47, 5%, 1 W, 2512"
R67 R69 R72 R73 R76 R79 R87 R92 R95 R98 R102 R109 R111 R202 R214: "RES, 1.00 k, 0.1%, 0.1 W, 0603"
R68: "RES, 0, 5%, 0.125 W, 0805"
R70 R75 R80 R82 R83 R196 R207 R208 R209 R211: "RES, 10.0 k, 1%, 0.1 W, 0603"
R71 R78 R90 R97 R107 R112 R190 R191 R192 R195: "RES, 1.0 M, 5%, 0.1 W, 0603"
R77: "RES, 1.6 k, 5%, 0.1 W, 0603"
R84 R85: "RES, 1.47 k, 1%, 0.1 W, 0603"
R86 R204: "RES, 100 k, 1%, 0.1 W, 0603"
R88 R188 R189 R193 R194 R197 R201 R203 R205 R206: "RES, 100, 5%, 0.1 W, 0603"
R89 R91: "RES, 1.82 k, 1%, 0.1 W, 0603"
R210: "RES, 2.00, 1%, 0.1 W, 0603"
R212: "RES, 523 k, 1%, 0.1 W, 0603"
R213: "RES, 169 k, 1%, 0.1 W, 0603"
R215: "RES, 1.0, 5%, 0.1 W, 0603"
RT1 RT2: "Thermistor NTC, 10.0k ohm, 1%, 0603"
T1: library part Q4470-CLB
TP5 TP6 TP-1 TP-2 TP-3 TP-4 TP-5 TP-6 TP-19 TP-AGN TP-C1 TP-C2 TP-SW1 TP-VPROG1 TP-VSS1 TP-VSS3: "Test Point, Miniature, SMT"
TP-20: "LOW PROFILE, TH"
U1: library part BQ76PL536APAPR, "Lithium-Ion Battery Monitor and Secondary Protection IC for Electric and Hybrid, -40 to 85 degC, 64-pin HTQFP (PAP), Green (RoHS & no Sb/Br)"
U4 U6: "25 Mbps Quad Channels, 3 / 1, Digital Isolator, 3.3 V / 5 V, -40 to +125 degC, 16-pin SOIC (DW), Green (RoHS & no Sb/Br)"
U5: "Remote 8-Bit I2C and SMBus Low-Power I/O Expander with Reset and Configuration Registers, 2.3 to 5.5 V, -40 to 85 degC, 16-pin TSSOP (PW), Green (RoHS & no Sb/Br)"
U7: "Single Output LDO, 100 mA, Fixed 3.3 V Output, 2.7 to 10 V Input, with Low IQ, 5-pin SOT-23 (DBV), -40 to 125 degC, Green (RoHS & no Sb/Br)"
U8: "LOW POWER CURRENT MODE PUSH-PULL PWM, D0008A"
U9: "Ultralow-Power 100-mA Low-Dropout Linear Regulators, DBV0005A"
Z1: "Diode, TVS, Bi, 36 V, 400 W, SMA"
Z2 Z3 Z4 Z5 Z6 Z7 Z8 Z9 Z10 Z11 Z12 Z13: "Diode, Zener, 5.6 V, 500 mW, SOD-123"

## Via types
v1: diameter 24, hole 12, Top Layer to Bottom Layer, tented both sides, 240 vias
v2: diameter 19.68, hole 7.87, Top Layer to Bottom Layer, 25 vias

## Nets (pads, with @x,y where several pads share a name; then routed paths per layer and width w, separated by ;. In a path a pad name is that pad's centre, name@x,y a point inside that pad or via, vN(x,y) a via of type N, cw(c..) or ccw(c..) an arc to the next point about the centre after c; other vN are vias at no path point)
1-ALERT: 
1-CB1: 
1-CB2: 
1-CB3: 
1-CB4: 
1-CB5: 
1-CB6: 
1-DRDY: 
1-FAULT: 
1-VC0: 
1-VC1: 
1-VC2: 
1-VC3: 
1-VC4: 
1-VC5: 
1-VC6: 
AGND: 
NetC1_1: 
NetC1_2: 
NetC2_2: 
NetC3_2: 
NetC5_2: 
NetC6_1: 
NetC7_1: 
NetC8_1: 
NetC9_1: 
NetC17_1: 
NetC17_2: 
NetC20_2: 
NetC22_1: 
NetC22_2: 
NetC23_2: 
NetC25_2: 
NetC28_2: 
NetC31_1: 
NetC32_1: 
NetC34_2: 
NetC39_1: 
NetC44_1: 
NetC46_1: 
NetC120_1: 
NetC121_1: 
NetC125_1: 
NetC126_1: 
NetC127_1: 
NetC130_1: 
NetC131_1: 
NetC136_1: 
NetD1_1: 
NetD1_2: 
NetD4_3: 
NetD4_4: 
NetD5_1: 
NetD6_1: 
NetJ1_2: 
NetJ2_1: 
NetJ3_1: 
NetJP13_2: 
NetJP14_2: 
NetJP15_2: 
NetJP16_2: 
NetJP17_2: 
NetJP18_2: 
NetP4_4: 
NetP4_7: 
NetP4_8: 
NetP4_10: 
NetP5_1: 
NetP5_3: 
NetP5_5: 
NetP5_7: 
NetP5_8: 
NetP5_9: 
NetP6_2: 
NetP6_3: 
NetP6_4: 
NetP6_5: 
NetP7_1: 
NetP7_5: 
NetP7_7: 
NetP7_8: 
NetP7_9: 
NetP8_1: 
NetP8_2: 
NetP8_3: 
NetP8_9: 
NetQ1_1: 
NetQ1_3: 
NetQ2_1: 
NetQ2_3: 
NetQ3_1: 
NetQ3_3: 
NetQ4_1: 
NetQ4_3: 
NetQ5_3: 
NetQ6_1: 
NetQ6_3: 
NetQ7_1: 
NetQ7_3: 
NetQ8_1: 
NetQ8_3: 
NetQ23_1: 
NetQ23_3: 
NetQ23_4: 
NetQ24_1: 
NetQ24_3: 
NetR1_1: 
NetR6_1: 
NetR8_1: 
NetR9_1: 
NetR13_1: 
NetR54_2: 
NetR55_2: 
NetR56_2: 
NetR86_1: 
NetR89_1: 
NetR91_1: 
NetR94_1: 
NetR99_2: 
NetR106_2: 
NetR188_2: 
NetR189_2: 
NetR190_1: 
NetR193_2: 
NetR194_2: 
NetR195_1: 
NetR197_1: 
NetR201_1: 
NetR203_1: 
NetR205_2: 
NetR206_1: 
NetR212_2: 
NetR214_1: 
pads on no net: C1.1 C1.2 C2.1 C2.2 C3.1 C3.2 C4.1 C4.2 C5.1 C5.2 C6.1 C6.2 C7.1 C7.2 C8.1 C8.2 C9.1 C9.2 C10.1 C10.2 C11.1 C11.2 C12.1 C12.2 C13.1 C13.2 C14.1 C14.2 C15.1 C15.2 C16.1 C16.2 C17.1 C17.2 C18.1 C18.2 C19.1 C19.2 C20.1 C20.2 C21.1 C21.2 C22.1 C22.2 C23.1 C23.2 C24.1 C24.2 C25.1 C25.2 C26.1 C26.2 C27.1 C27.2 C28.1 C28.2 C29.1 C29.2 C30.1 C30.2 C31.1 C31.2 C32.1 C32.2 C33.1 C33.2 C34.1 C34.2 C35.1 C35.2 C36.1 C36.2 C37.1 C37.2 C38.1 C38.2 C39.1 C39.2 C40.1 C40.2 C41.1 C41.2 C42.1 C42.2 C43.1 C43.2 C44.1 C44.2 C45.1 C45.2 C46.1 C46.2 C47.1 C47.2 C120.1 C120.2 C121.1 C121.2 C122.1 C122.2 C123.1 C123.2 C124.1 C124.2 C125.1 C125.2 C126.1 C126.2 C127.1 C127.2 C128.1 C128.2 C129.1 C129.2 C130.1 C130.2 C131.1 C131.2 C132.1 C132.2 C133.1 C133.2 C134.1 C134.2 C135.1 C135.2 C136.1 C136.2 C137.1 C137.2 D1.1 D1.2 D4.1 D4.2 D4.3 D4.4 D4.5 D4.6 D4.7 D4.8 D5.1 D5.2 D6.1 D6.2 FID1.1 FID2.1 H1. H2. H3. H4. J1.1 J1.2 J2.1 J2.2 J3.1 J3.2 JP13.1 JP13.2 JP14.1 JP14.2 JP15.1 JP15.2 JP16.1 JP16.2 JP17.1 JP17.2 JP18.1 JP18.2 JP19.1 JP19.2 JP19.3 L1.1 L1.2 P1.1 P1.2 P1.3 P1.4 P1.5 P1.6 P1.7 P4.1 P4.2 P4.3 P4.4 P4.5 P4.6 P4.7 P4.8 P4.9 P4.10 P5.1 P5.2 P5.3 P5.4 P5.5 P5.6 P5.7 P5.8 P5.9 P5.10 P6.1 P6.2 P6.3 P6.4 P6.5 P6.6 P6.7 P6.8 P6.9 P6.10 P7.1 P7.2 P7.3 P7.4 P7.5 P7.6 P7.7 P7.8 P7.9 P7.10 P8.1 P8.2 P8.3 P8.4 P8.5 P8.6 P8.7 P8.8 P8.9 P8.10 Q1.1 Q1.2 Q1.3 Q1.4 Q1.5 Q1.6 Q1.7 Q1.8 Q2.1 Q2.2 Q2.3 Q2.4 Q2.5 Q2.6 Q2.7 Q2.8 Q3.1 Q3.2 Q3.3 Q3.4 Q3.5 Q3.6 Q3.7 Q3.8 Q4.1 Q4.2 Q4.3 Q4.4 Q4.5 Q4.6 Q4.7 Q4.8 Q5.1 Q5.2 Q5.3 Q5.4 Q5.5 Q5.6 Q5.7 Q5.8 Q6.1 Q6.2 Q6.3 Q6.4 Q6.5 Q6.6 Q6.7 Q6.8 Q7.1 Q7.2 Q7.3 Q7.4 Q7.5 Q7.6 Q7.7 Q7.8 Q8.1 Q8.2 Q8.3 Q8.4 Q8.5 Q8.6 Q8.7 Q8.8 Q23.1 Q23.2 Q23.3 Q23.4 Q23.5 Q23.6 Q23.7 Q23.8 Q24.1 Q24.2 Q24.3 Q24.4 Q24.5 Q24.6 Q24.7 Q24.8 R1.1 R1.2 R2.1 R2.2 R3.1 R3.2 R4.1 R4.2 R5.1 R5.2 R6.1 R6.2 R7.1 R7.2 R8.1 R8.2 R9.1 R9.2 R10.1 R10.2 R11.1 R11.2 R12.1 R12.2 R13.1 R13.2 R47.1 R47.2 R48.1 R48.2 R49.1 R49.2 R50.1 R50.2 R51.1 R51.2 R52.1 R52.2 R53.1 R53.2 R54.1 R54.2 R55.1 R55.2 R56.1 R56.2 R57.1 R57.2 R58.1 R58.2 R59.1 R59.2 R60.1 R60.2 R61.1 R61.2 R62.1 R62.2 R63.1 R63.2 R64.1 R64.2 R65.1 R65.2 R66.1 R66.2 R67.1 R67.2 R68.1 R68.2 R69.1 R69.2 R70.1 R70.2 R71.1 R71.2 R72.1 R72.2 R73.1 R73.2 R74.1 R74.2 R75.1 R75.2 R76.1 R76.2 R77.1 R77.2 R78.1 R78.2 R79.1 R79.2 R80.1 R80.2 R81.1 R81.2 R82.1 R82.2 R83.1 R83.2 R84.1 R84.2 R85.1 R85.2 R86.1 R86.2 R87.1 R87.2 R88.1 R88.2 R89.1 R89.2 R90.1 R90.2 R91.1 R91.2 R92.1 R92.2 R93.1 R93.2 R94.1 R94.2 R95.1 R95.2 R96.1 R96.2 R97.1 R97.2 R98.1 R98.2 R99.1 R99.2 R100.1 R100.2 R101.1 R101.2 R102.1 R102.2 R103.1 R103.2 R104.1 R104.2 R105.1 R105.2 R106.1 R106.2 R107.1 R107.2 R108.1 R108.2 R109.1 R109.2 R110.1 R110.2 R111.1 R111.2 R112.1 R112.2 R188.1 R188.2 R189.1 R189.2 R190.1 R190.2 R191.1 R191.2 R192.1 R192.2 R193.1 R193.2 R194.1 R194.2 R195.1 R195.2 R196.1 R196.2 R197.1 R197.2 R198.1 R198.2 R199.1 R199.2 R200.1 R200.2 R201.1 R201.2 R202.1 R202.2 R203.1 R203.2 R204.1 R204.2 R205.1 R205.2 R206.1 R206.2 R207.1 R207.2 R208.1 R208.2 R209.1 R209.2 R210.1 R210.2 R211.1 R211.2 R212.1 R212.2 R213.1 R213.2 R214.1 R214.2 R215.1 R215.2 RT1.1 RT1.2 RT2.1 RT2.2 T1.1 T1.2 T1.3 T1.4 T1.5 T1.6 TP5.1 TP6.1 TP-1.1 TP-2.1 TP-3.1 TP-4.1 TP-5.1 TP-6.1 TP-19.1 TP-20.1 TP-AGN.1 TP-C1.1 TP-C2.1 TP-SW1.1 TP-VPROG1.1 TP-VSS1.1 TP-VSS3.1 U1.1 U1.2 U1.3 U1.4 U1.5 U1.6 U1.7 U1.8 U1.9 U1.10 U1.11 U1.12 U1.13 U1.14 U1.15 U1.16 U1.17 U1.18 U1.19 U1.20 U1.21 U1.22 U1.23 U1.24 U1.25 U1.26 U1.27 U1.28 U1.29 U1.30 U1.31 U1.32 U1.33 U1.34 U1.35 U1.36 U1.37 U1.38 U1.39 U1.40 U1.41 U1.42 U1.43 U1.44 U1.45 U1.46 U1.47 U1.48 U1.49 U1.50 U1.51 U1.52 U1.53 U1.54 U1.55 U1.56 U1.57 U1.58 U1.59 U1.60 U1.61 U1.62 U1.63 U1.64 U1.65 U4.1 U4.2 U4.3 U4.4 U4.5 U4.6 U4.7 U4.8 U4.9 U4.10 U4.11 U4.12 U4.13 U4.14 U4.15 U4.16 U5.1 U5.2 U5.3 U5.4 U5.5 U5.6 U5.7 U5.8 U5.9 U5.10 U5.11 U5.12 U5.13 U5.14 U5.15 U5.16 U6.1 U6.2 U6.3 U6.4 U6.5 U6.6 U6.7 U6.8 U6.9 U6.10 U6.11 U6.12 U6.13 U6.14 U6.15 U6.16 U7.1 U7.2 U7.3 U7.4 U7.5 U8.1 U8.2 U8.3 U8.4 U8.5 U8.6 U8.7 U8.8 U9.1 U9.2 U9.3 U9.4 U9.5 Z1.1 Z1.2 Z2.1 Z2.2 Z3.1 Z3.2 Z4.1 Z4.2 Z5.1 Z5.2 Z6.1 Z6.2 Z7.1 Z7.2 Z8.1 Z8.2 Z9.1 Z9.2 Z10.1 Z10.2 Z11.1 Z11.2 Z12.1 Z12.2 Z13.1 Z13.2